# Altium PCB sciencelayout.PcbDoc
Units mm, origin at the board's own origin, x right, y up, seen from the top; angles counter-clockwise.
Board outline 63.5 x 88.9 mm, 2 copper layers (Top Layer, Bottom Layer); 114 components, 56 nets, 362 pads, 0 vias.
Unrouted connection lines stored in the file: 252.
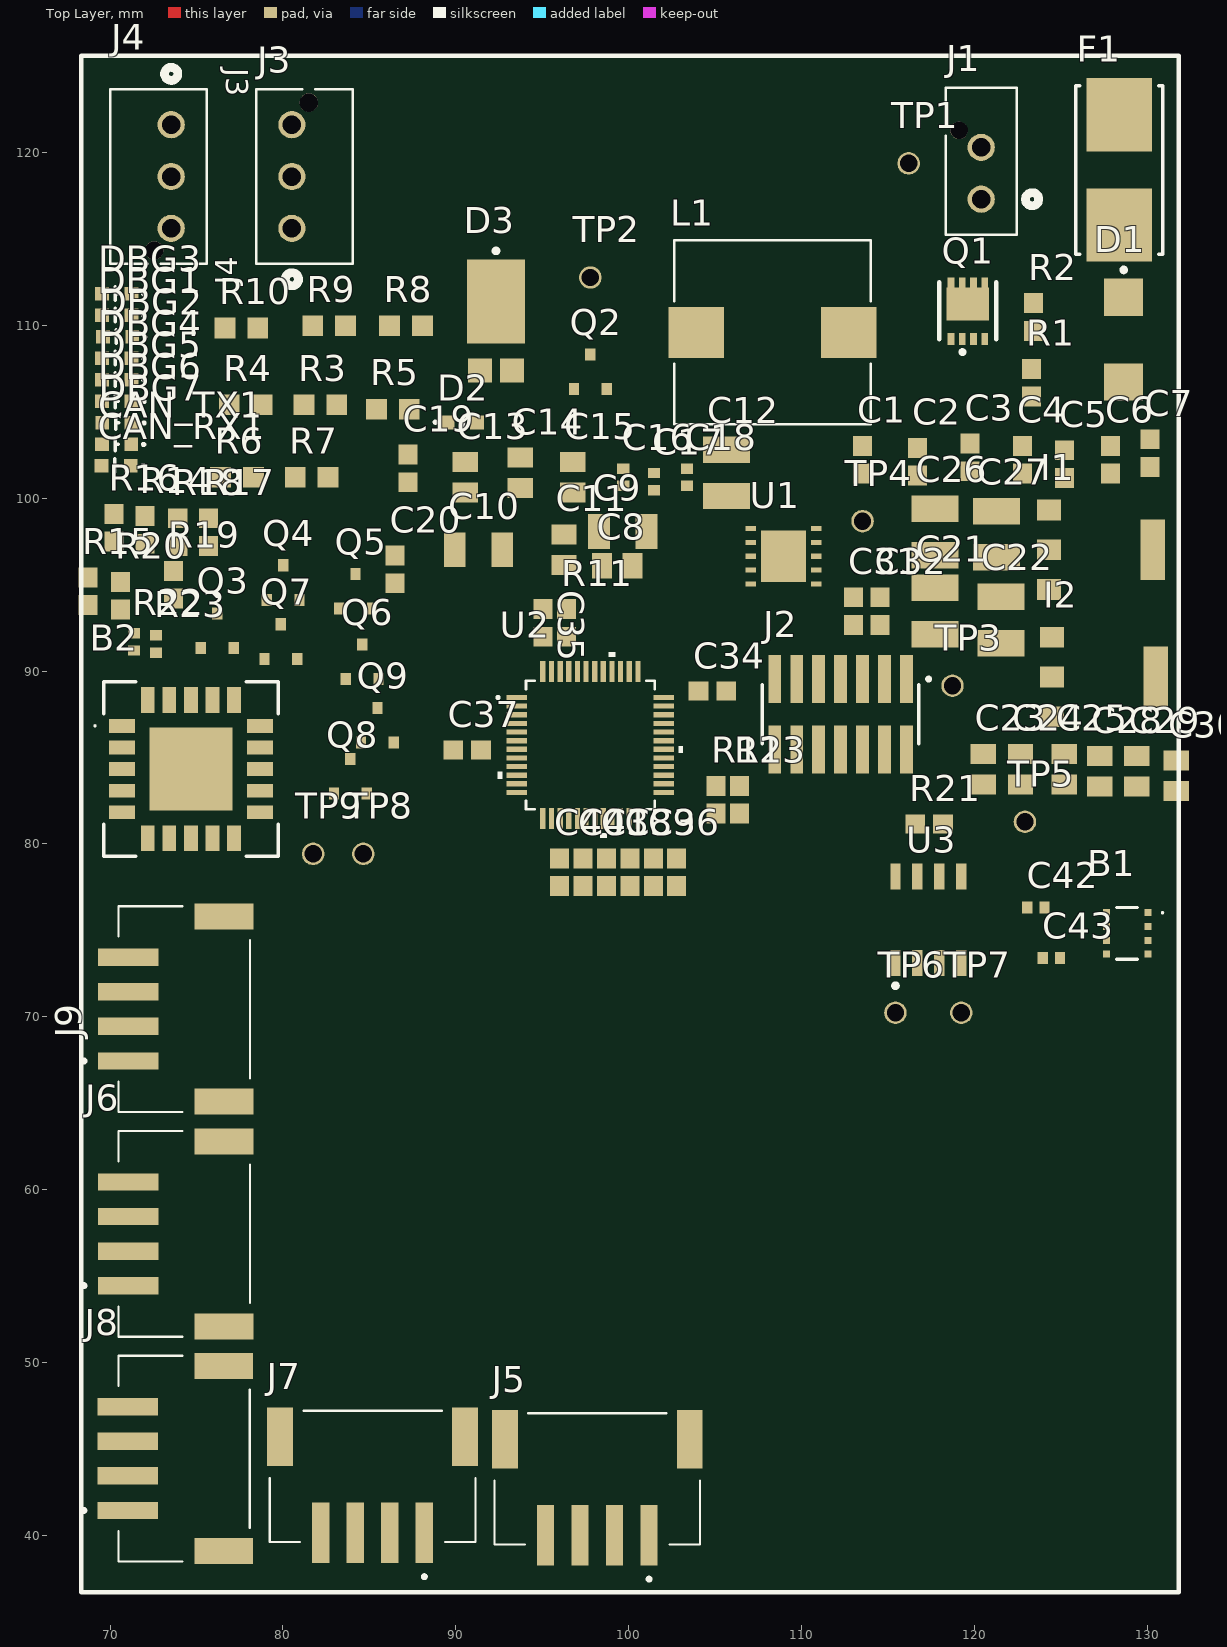
[diagram p0: Top Layer view]
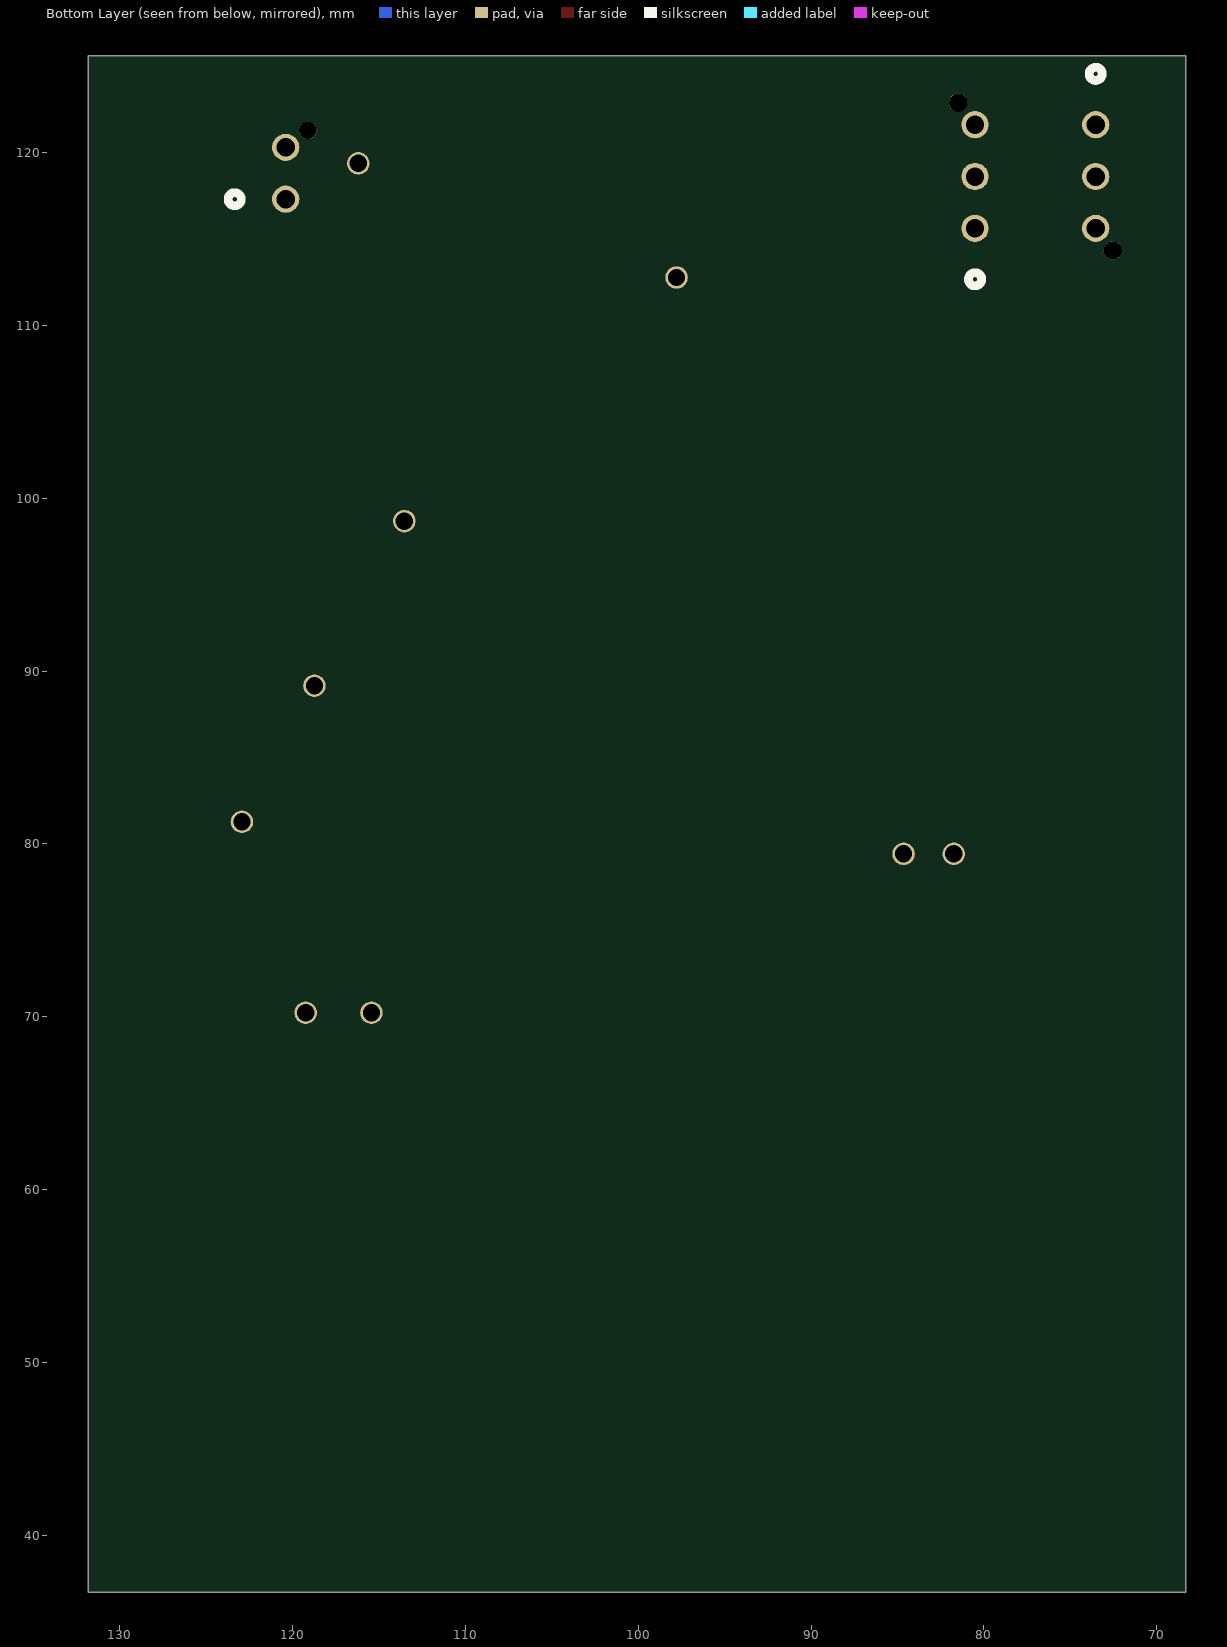
[diagram p1: Bottom Layer view, seen from below]

## Layer stack, top to bottom
Top Solder: solder mask 0.0102, Solder Resist, Dk 3.5
Top Layer: signal copper 0.0356
Dielectric 1: dielectric 0.32, FR-4, Dk 4.8
Bottom Layer: signal copper 0.0356
Bottom Solder: solder mask 0.0102, Solder Resist, Dk 3.5

## Board outline
68.326,36.703 68.326,125.603 131.826,125.603 131.826,36.703

## Design rules (kind name [scope] priority, off if disabled: settings)
Clearance [All] p1: gap=0.254 ignorepadtopadclearanceinfootprint=FALSE
PolygonConnect [All] p1: connectstyle=Relief reliefconductorwidth=0.254 reliefentries=4 polygonreliefangle="90 Angle" airgapwidth=0.254
RoutingVias [All] p1: holewidth=0.711 width=1.27 viastyle="Through Hole" minholewidth=0.711 minwidth=1.27 maxholewidth=0.711 maxwidth=1.27
SolderMaskExpansion [All] p1: expansion=0 istentingtop=FALSE
SupplyNets "Schematic Supply Nets_6" [InNet('VDD')] p1: voltage=0.000
SupplyNets "Schematic Supply Nets_5" [InNet('7V')] p2: voltage=0.000
SupplyNets "Schematic Supply Nets_4" [InNet('VBAT')] p3: voltage=0.000
SupplyNets "Schematic Supply Nets_3" [InNet('GND')] p4: voltage=0.000
SupplyNets "Schematic Supply Nets_2" [InNet('VBAT_FUSED_7')] p5: voltage=0.000
SupplyNets "Schematic Supply Nets_1" [InNet('5V')] p6: voltage=0.000
Width [All] p1: maxlimit=0.254 minlimit=0.254 preferedwidth=0.254
30 further rules are at their usual default settings.

## Classes and differential pairs
component class THP_Sensor: B1 C42 C43
component class MCU: C31 C32 C34 C35 C36 C37 C38 C39 C40 C41 J2 R11 R12 R13 U2
component class LDOs: C21 C22 C23 C24 C25 C26 C27 C28 C29 C30 I1 I2 TP3 TP4 TP5
component class "Input Power": C1 C2 C3 C4 C5 C6 C7 D1 F1 J1 Q1 R1 R2 TP1
component class Headers: J5 J6 J7 J8 J9 M2
component class "Debugging LED": DBG1 DBG2 DBG3 DBG4 DBG5 DBG6 DBG7 Q3 Q4 Q5 Q6 Q7 R14 R15 R16 R17 R18 R19 R20
component class CO2_Sensor: B2 TP8 TP9
component class CAN: CAN_RX1 CAN_TX1 J3 J4 Q8 Q9 R21 R22 R23 TP6 TP7 U3
component class "7V Buck": C8 C9 C10 C11 C12 C13 C14 C15 C16 C17 C18 C19 C20 D2 D3 D23 L1 L2 Q2 R3 R4 R5 R6 R7 R8 R9 R10 TP2 U1 U9

## Components (designator, comment, footprint, x,y, rotation, side; value= is the part's Value field where it differs from the comment)
B1 "BME688" BME688 128.848,74.822 r0 top
B2 "SCD43-D-R2" SCD43DR2 74.676,84.328 r0 top
C1 "GRJ32ER71H106KE11L" CAP-0603 113.538,102.235 r270 top
C2 "GRJ32ER71H106KE11L" CAP-0603 116.713,102.108 r90 top
C3 "GRJ32ER71H106KE11L" CAP-0603 119.761,102.362 r90 top
C4 "GCM188R71H104KA57D" CAP-0603 122.809,102.235 r90 top
C5 "GRM1885C1H103JA01D" CAP-0603 125.222,101.981 r90 top
C6 "GRM1885C1H102JA01D" CAP-0603 127.889,102.235 r90 top
C7 "GRM1885C1H101JA01D" CAP-0603 130.175,102.616 r90 top
C8 "CC0805KRX7R9BB104" CAP-0805 99.354,96.088 r0 top
C9 "CC1206KKX7R0BB225" CAP-1206 99.664,98.077 r0 top
C10 "CC1206KKX7R0BB225" CAP-1206 91.313,97.028 r0 top
C11 "GRM2165C1H272JA01D" CAP-0805 96.266,97.028 r90 top
C12 "CL32B106KBJNNNE" CAP-1210 105.664,101.473 r90 top
C13 "CC0805KKX7R9BB105" CAP-0805 90.551,101.219 r90 top
C14 "CC0805KRX7R9BB104" CAP-0805 93.726,101.473 r90 top
C15 "GRM2195C1H103JA01D" CAP-0805 96.774,101.219 r90 top
C16 "CC0402KRX7R9BB102" CAP-0402 99.695,101.219 r90 top
C17 "CC0402JRNPO9BN101" CAP-0402 101.473,100.965 r90 top
C18 "CC0402JRNPO9BN100" CAP-0402 103.378,101.219 r90 top
C19 "GRM1885C1H302JA01D" CAP-0603 87.249,101.727 r90 top
C20 "CC0603CRNPO0BN6R8" CAP-0603 86.487,95.885 r90 top
C21 "CL32B106KMVNNWE" CAP-1210 117.729,93.472 r90 top
C22 "CL32B106KMVNNWE" CAP-1210 121.539,92.964 r90 top
C23 "CL21B104KBCNNNC" CAP-0805 120.523,84.328 r90 top
C24 "C0805C471K5RACTU" CAP-0805 122.682,84.328 r90 top
C25 "CC0805JKX7R9BB105" CAP-0805 125.222,84.328 r90 top
C26 "CL32B106KMVNNWE" CAP-1210 117.729,98.044 r90 top
C27 "CL32B106KMVNNWE" CAP-1210 121.285,97.917 r90 top
C28 "CL21B104KBCNNNC" CAP-0805 127.254,84.201 r90 top
C29 "C0805C471K5RACTU" CAP-0805 129.413,84.201 r90 top
C30 "CC0805JKX7R9BB105" CAP-0805 131.699,83.947 r90 top
C31 "CAP 0603" CAP-0603 113.03,93.472 r90 top
C32 "CAP 0603" CAP-0603 114.554,93.472 r90 top
C33 "CAP 0603" CAP-0603 102.784,78.359 r90 top
C34 "CAP 0603" CAP-0603 104.85,88.845 r180 top
C35 "CAP 0603" CAP-0603 95.056,92.785 r270 top
C36 "CAP 0603" CAP-0603 101.43,78.359 r90 top
C37 "CAP 0603" CAP-0603 90.658,85.428 r180 top
C38 "CAP 0603" CAP-0603 98.722,78.359 r90 top
C39 "CAP 0603" CAP-0603 100.076,78.359 r90 top
C40 "CAP 0603" CAP-0603 96.014,78.359 r90 top
C41 "CAP 0603" CAP-0603 97.368,78.359 r90 top
C42 "CAP 0402" CAP-0402 123.571,76.327 r0 top
C43 "CAP 0402" CAP-0402 124.468,73.406 r0 top
CAN_RX1 "BL-HKC36G-AV-TRB" LED-0603 71.787,102.632 r180 top
CAN_TX1 "BL-HKC36G-AV-TRB" LED-0603 71.815,103.876 r180 top
D1 "SMBJ40CA" "DO-214AA (SMBJ)" 128.651,109.149 r90 top
D2 "BL-HKC36G-AV-TRB" LED-0603 88.946,103.643 r0 top
D3 "PDS760-13" DO-POWERDI5 92.329,110.253 r90 top
DBG1 "BL-HKC36G-AV-TRB" LED-0603 71.824,111.343 r180 top
DBG2 "BL-HKC36G-AV-TRB" LED-0603 71.874,110.098 r180 top
DBG3 "BL-HKC36G-AV-TRB" LED-0603 71.824,112.587 r180 top
DBG4 "BL-HKC36G-AV-TRB" LED-0603 71.824,108.854 r180 top
DBG5 "BL-HKC36G-AV-TRB" LED-0603 71.824,107.609 r180 top
DBG6 "BL-HKC36G-AV-TRB" LED-0603 71.824,106.365 r180 top
DBG7 "BL-HKC36G-AV-TRB" LED-0603 71.836,105.121 r180 top
F1 "01550900M" FUSE-0001 128.397,118.999 r90 top
I1 "LM1117IMPX-3.3/NOPB" IC-SOT-223-4 127.333,97.028 r0 top
I2 "LM1117MPX-5.0/NOPB" IC-SOT-223-4 127.508,89.662 r0 top
J1 "2068320201" CONN_2068320000-SD_02_MOL 120.406,117.305 r0 top
J2 "FTSH-107-01-L-DV-K" SAMTEC_FTSH-107-01-L-DV-K 112.268,87.506 r180 top
J3 "2165712003" CONN_2165710003-SD_03_MOL 80.518,115.618 r270 top
J4 "2165712003" CONN_2165710003-SD_03_MOL 73.533,121.618 r90 top
J5 "CONN-4POS-03" CONN-4POS-03 98.189,42.756 r180 top
J6 "CONN-4POS-03" CONN-4POS-03 73.788,57.438 r90 top
J7 "CONN-4POS-03" CONN-4POS-03 85.185,42.898 r180 top
J8 "CONN-4POS-03" CONN-4POS-03 73.781,44.434 r90 top
J9 "CONN-4POS-03" CONN-4POS-03 73.787,70.442 r90 top
L1 "BMRF001010401R0MD1" IND-10UH-0001 108.331,109.601 r0 top
Q1 "CSD18543Q3AT" IC-8VSONCLIP 117.797,108.335 r0 top
Q2 "T2N7002AK,LM" IC-SOT23-3 97.79,107.315 r0 top
Q3 "T2N7002AK,LM" IC-SOT23-3 76.2,92.345 r0 top
Q4 "T2N7002AK,LM" IC-SOT23-3 80.01,95.123 r0 top
Q5 "T2N7002AK,LM" IC-SOT23-3 84.201,94.615 r0 top
Q6 "T2N7002AK,LM" IC-SOT23-3 84.582,90.551 r0 top
Q7 "T2N7002AK,LM" IC-SOT23-3 79.883,91.71 r0 top
Q8 "T2N7002AK,LM" IC-SOT23-3 83.904,83.914 r0 top
Q9 "T2N7002AK,LM" IC-SOT23-3 85.471,86.868 r0 top
R1 "RC0603JR-07200KL" RES-0603 123.317,106.68 r90 top
R2 "RC0603FR-07100KL" RES-0603 123.444,110.49 r90 top
R3 "ERJ-6GEYJ241V" RES-0805 82.169,105.41 r0 top
R4 "CRCW08051K00FKEA" RES-0805 77.851,105.41 r0 top
R5 "CRCW08052M15FKEA" RES-0805 86.36,105.156 r0 top
R6 "RC0805FR-07178KL" RES-0805 77.343,101.219 r0 top
R7 "CRCW080580K6FKEA" RES-0805 81.661,101.219 r0 top
R8 "ERA-6AEB104V" RES-0805 87.122,109.982 r0 top
R9 "RC0805FR-0736K5L" RES-0805 82.677,109.982 r0 top
R10 "RT0805BRD0710K4L" RES-0805 77.597,109.855 r0 top
R11 "RES 0603" RES-0603 96.411,92.785 r270 top
R12 "RES 0603" RES-0603 105.072,82.55 r270 top
R13 "RES 0603" RES-0603 106.426,82.55 r270 top
R14 "RES 0603" RES-0603 72.009,98.171 r90 top
R15 "RES 0603" RES-0603 68.707,94.615 r90 top
R16 "RES 0603" RES-0603 70.231,98.298 r90 top
R17 "RES 0603" RES-0603 75.692,98.044 r90 top
R18 "RES 0603" RES-0603 73.914,98.044 r90 top
R19 "RES 0603" RES-0603 73.66,94.996 r90 top
R20 "RES 0603" RES-0603 70.612,94.361 r90 top
R21 "RES 0603" RES-0603 117.386,81.153 r180 top
R22 "RES 0402" RES-0402 71.374,91.694 r90 top
R23 "RES 0603" RES-0402 72.644,91.567 r90 top
TP1 "5003" TEST-POINT-0001 116.205,119.38 r0 top
TP2 "5003" TEST-POINT-0001 97.79,112.776 r0 top
TP3 "5003" TEST-POINT-0001 118.745,89.154 r0 top
TP4 "5003" TEST-POINT-0001 113.538,98.679 r0 top
TP5 "5003" TEST-POINT-0001 122.936,81.28 r0 top
TP6 "5003" TEST-POINT-0001 115.443,70.231 r0 top
TP7 "5003" TEST-POINT-0001 119.253,70.231 r0 top
TP8 "5003" TEST-POINT-0001 84.652,79.425 r0 top
TP9 "5003" TEST-POINT-0001 81.748,79.425 r0 top
U1 "" IC-10WSON 108.966,96.647 r0 top
U2 "STM32G431CBT6" IC-LQFP48 97.79,85.725 r0 top
U3 "TCAN1044VDRQ1" IC-8SOIC 117.348,75.605 r0 top

## Footprints (in the part's own frame and the unit in brackets; to place one, negate y for a bottom-side part, rotate by r counter-clockwise, add the part's x,y. Pads: shape width x height; smd on the part's side, far side on the other; paste and mask are expansions set on the pad)
BME688 [mm]
  rect 0.4x0.4 smd: 1(1.2,1.2) 2(1.2,0.4) 3(1.2,-0.4) 4(1.2,-1.2) 5(-1.2,-1.2) 6(-1.2,-0.4) 7(-1.2,0.4) 8(-1.2,1.2)
  silkscreen extent -0.6,-1.5 2.1,1.5
CAP-0402 [mm]
  rect 0.6x0.7 smd: 1(-0.5,0) 2(0.5,0)
  body extent -0.5,-0.22 0.5,0.23, height 0.5
CAP-0603 [mm]
  rect 1.15x1.1 smd: 1(-0.8,0) 2(0.8,0)
  body extent -0.8,-0.45 0.8,0.45, height 0.8
CAP-0805 [mm]
  rect 1.16x1.47 smd: 1(-0.88,0) 2(0.88,0)
  body extent -1,-0.63 1,0.63, height 0.94
CAP-1206 [mm]
  rect 1.25x2 smd: 1(-1.375,0) 2(1.375,0)
  body extent -1.6,-0.8 1.6,0.8, height 1.5
CAP-1210 [mm]
  rect 1.53x2.72 smd: 1(-1.341,0) 2(1.341,0)
  body extent -1.6,-1.25 1.6,1.25, height 2.7
CONN-4POS-03 [mm] "JST 4 pin right angle"
  rect 1x3.5 smd paste+0 mask+0.102: 1(-3,2.75) 2(-1,2.75) 3(1,2.75) 4(3,2.75)
  rect 1.5x3.4 smd paste+0 mask+0.102: T1(-5.35,-2.8) T2(5.35,-2.8)
  silkscreen extent -5.95,-4.3 5.95,5.4, body extent -5.95,-4.3 5.95,4.3, height 5.5
CONN_2068320000-SD_02_MOL [mil]
  round 62 / inner round 60 / far side round 62 hole 42 paste-99999 mask+0: 1(0,0) 2(0,118.11)
  round 40 / inner round 60 / far side round 40 hole 40 unplated paste-99999 mask+0: 3(-50.39,156.69)
  silkscreen extent -81,-81 131,254, body extent -76,-76 76,249, height 392
CONN_2165710003-SD_03_MOL [mil]
  round 62 hole 42 paste-99999 mask+0: 1(0,0) 2(-118.11,0) 3(-236.22,0)
  round 42 hole 42 unplated paste-99999 mask+0: 4(-286.61,38.58)
  silkscreen extent -317,-81 131,139, body extent -312,-75 76,135, height 394
"DO-214AA (SMBJ)" [mm]
  rect 2.16x2.26 smd: 1(-2.416,0) 2(2.484,0)
  silkscreen extent 3.94,-0.13 4.19,0.12, body extent -2.72,-1.95 2.78,1.95, height 2.45
DO-POWERDI5 [mm] "SMD, 3-Leads, Body 3.975x5.375mm, Pitch 1.84mm"
  rect 1.4x1.39 smd: 1(-2.856,-0.92) 1(-2.856,0.92)
  rect 4.86x3.36 smd: 2(1.126,0)
  silkscreen extent 3.94,-0.13 4.19,0.12, body extent -3.25,-1.98 3.25,1.98, height 1.15
FUSE-0001 [mil]
  rect 167x150 smd paste+0 mask+0: 1(-125.5,0) 2(125.5,0)
  silkscreen extent -192,-99 192,99, body extent -213,-103 213,103, height 10
IC-8SOIC [mm]
  rect 0.6x1.5 smd: 1(-1.905,-2.5) 2(-0.635,-2.5) 3(0.635,-2.5) 4(1.905,-2.5) 5(1.905,2.5) 6(0.635,2.5) 7(-0.635,2.5) 8(-1.905,2.5)
  silkscreen extent -2.03,-3.93 -1.78,-3.69, body extent -2.45,-3 2.45,3, height 1.75
IC-8VSONCLIP [mm]
  rect 0.4x0.7 smd paste-100 mask+0.05: 1(2.812,0.877) 2(0.862,0.877) 2(1.512,0.877) 2(2.162,0.877) 3(0.862,4.077) 3(1.512,4.077) 3(2.162,4.077) 3(2.812,4.077)
  rect 2.45x1.9 smd paste-100 mask+0.05: 3(1.837,2.917)
  silkscreen extent 0.19,0.03 3.49,4.18, body extent 0.18,0.89 3.48,4.19, height 1.1
IC-10WSON [mm]
  rect 0.6x0.3 smd: 1(-1.9,1.6) 2(-1.9,0.8) 3(-1.9,0) 4(-1.9,-0.8) 5(-1.9,-1.6) 6(1.9,-1.6) 7(1.9,-0.8) 8(1.9,0) 9(1.9,0.8) 10(1.9,1.6)
  rect 2.6x3 smd: 11(0,0)
  body extent -2,-2 2,2, height 0.8
IC-LQFP48 [mm]
  rect 1.194x0.305 smd paste+0 mask+0: 1(-4.25,2.75) 2(-4.25,2.25) 3(-4.25,1.75) 4(-4.25,1.25) 5(-4.25,0.75) 6(-4.25,0.25) 7(-4.25,-0.25) 8(-4.25,-0.75) 9(-4.25,-1.25) 10(-4.25,-1.75) 11(-4.25,-2.25) 12(-4.25,-2.75) 25(4.25,-2.75) 26(4.25,-2.25) 27(4.25,-1.75) 28(4.25,-1.25) 29(4.25,-0.75) 30(4.25,-0.25) 31(4.25,0.25) 32(4.25,0.75) 33(4.25,1.25) 34(4.25,1.75) 35(4.25,2.25) 36(4.25,2.75)
  rect 0.305x1.194 smd paste+0 mask+0: 13(-2.75,-4.25) 14(-2.25,-4.25) 15(-1.75,-4.25) 16(-1.25,-4.25) 17(-0.75,-4.25) 18(-0.25,-4.25) 19(0.25,-4.25) 20(0.75,-4.25) 21(1.25,-4.25) 22(1.75,-4.25) 23(2.25,-4.25) 24(2.75,-4.25) 37(2.75,4.25) 38(2.25,4.25) 39(1.75,4.25) 40(1.25,4.25) 41(0.75,4.25) 42(0.25,4.25) 43(-0.25,4.25) 44(-0.75,4.25) 45(-1.25,4.25) 46(-1.75,4.25) 47(-2.25,4.25) 48(-2.75,4.25)
  silkscreen extent -5.43,-5.35 5.35,5.35, body extent -4.5,-4.5 4.5,4.5, height 1.6
IC-SOT23-3 [mm]
  rect 0.6x0.7 smd: 1(-0.95,-1) 2(0.95,-1) 3(0,1)
  body extent -1.46,-1.18 1.46,1.19, height 1.12
IC-SOT-223-4 [mm]
  rect 1.4x1.2 smd mask+0.07: 1(-3,2.3) 3(-3,-2.3) 4(-3,0)
  rect 1.4x3.5 smd: 2(3,0)
  body extent -3.5,-3.25 3.5,3.25, height 1.68
IND-10UH-0001 [mil]
  rect 126x116 smd paste+0 mask+0: 1(-173.5,0) 2(173.5,0)
  silkscreen extent -224,-210 224,210, body extent -229,-204 229,204, height 157
LED-0603 [mm]
  rect 0.8x0.8 smd: 1(2.291,0.751) 2(0.589,0.751)
  silkscreen extent -0.2,0.34 1.52,1.13, body extent 0.65,0.36 2.25,1.16, height 0.39
RES-0402 [mm]
  rect 0.6x0.7 smd: 1(-0.5,0) 2(0.5,0)
  body extent -0.5,-0.25 0.5,0.25, height 0.3
RES-0603 [mm]
  rect 1.15x1.1 smd: 1(-0.8,0) 2(0.8,0)
  body extent -0.8,-0.4 0.8,0.4, height 0.43
RES-0805 [mm]
  rect 1.2x1.2 smd: 1(-0.95,0) 2(0.95,0)
  body extent -1,-0.6 1,0.6, height 0.71
SAMTEC_FTSH-107-01-L-DV-K [mm]
  rect 0.74x2.79 smd: 01(-3.81,-2.035) 02(-3.81,2.035) 03(-2.54,-2.035) 04(-2.54,2.035) 05(-1.27,-2.035) 06(-1.27,2.035) 07(0,-2.035) 08(0,2.035) 09(1.27,-2.035) 10(1.27,2.035) 11(2.54,-2.035) 12(2.54,2.035) 13(3.81,-2.035) 14(3.81,2.035)
  silkscreen extent -5.2,-2.13 4.53,1.72, body extent -4.45,-2.82 4.44,3.02, height 5.96
SCD43DR2 [mm]
  rect 1.5x0.8 smd: 1(-4,2.5) 2(-4,1.25) 3(-4,0) 4(-4,-1.25) 5(-4,-2.5) 11(4,-2.5) 12(4,-1.25) 13(4,0) 14(4,1.25) 15(4,2.5)
  rect 0.8x1.5 smd: 6(-2.5,-4) 7(-1.25,-4) 8(0,-4) 9(1.25,-4) 10(2.5,-4) 16(2.5,4) 17(1.25,4) 18(0,4) 19(-1.25,4) 20(-2.5,4)
  rect 4.8x4.8 smd: 21(0,0)
  silkscreen extent -5.6,-5.05 5.05,5.05
TEST-POINT-0001 [mm] "2024 miniature test point"
  round 1.3 hole 1: 1(0,0)
  body extent -1.27,-1.27 1.27,1.27, height 4.57

## Part data
B1: "Gas sensor measuring relative humidity, barometric pressure, ambient temperature and gas (VOC)", Manufacturer_Name=BOSCH, Mouser Part Number=262-BME688, Arrow Part Number=BME688, Arrow Price/Stock=https://www.arrow.com/en/products/bme688/bosch-sensortec.html?utm_currency=USD&region=nac, Datasheet Link=https://www.bosch-sensortec.com/media/boschsensortec/downloads/datasheets/bst-bme688-ds000.pdf, Geometry.Height=1mm, Manufacturer_Part_Number=BME688, Mouser Price/Stock=https://www.mouser.co.uk/ProductDetail/Bosch-Sensortec/BME688?qs=IS%252B4QmGtzzqQoVDscqwx3A%3D%3D
B2: "Carbon Dioxide (CO2) Sensor Voltage 2.4V ~ 5.5V , 205mA , 400 kHz  -10C ~ 60C", Manufacturer_Name=Sensirion, Datasheet Link=https://sensirion.com/media/documents/48C4B7FB/67FE0194/CD_DS_SCD4x_Datasheet_D1.pdf, Geometry.Height=6.8mm, Manufacturer_Part_Number=SCD43-D-R2
C1: library part "CAP 0603", Capacitance=100uF, Voltage Rating=50V
C2: library part "CAP 0603", Capacitance=10uF, Voltage Rating=50V
C3: library part "CAP 0603", Capacitance=1uF, Voltage Rating=50V
C4: library part "CAP 0603", Capacitance=100nF, Voltage Rating=50V
C5: library part "CAP 0603", Capacitance=10nF, Voltage Rating=50V
C6: library part "CAP 0603", Capacitance=1nF, Voltage Rating=50V
C7: library part "CAP 0603", Capacitance=100pF, Voltage Rating=50V
C8 C14: library part CAP-0.1U-0002, "CAP CER 0.1UF 50V X7R 0805", Capacitance="100 nF", Voltage Rating="50 V", ComponentLink2Description=Datasheet, ComponentLink2URL=https://www.yageo.com/upload/media/product/productsearch/datasheet/mlcc/UPY-GPHC_X7R_6.3V-to-250V_24.pdf, Device Class=Ceramic, Size=0805
C9 C10: library part CAP-2.2U-0001, "CAP CER 2.2UF 100V X7R 1206", Capacitance=2.2uF, Voltage=100V, ComponentLink1Description=Datasheet, ComponentLink1URL=https://www.yageo.com/upload/media/product/productsearch/datasheet/mlcc/UPY-GPHC_X7R_6.3V-to-250V_24.pdf, Device Class=Ceramic, Size=1206
C11: library part CAP-2.7N-0001, "CAP CER 2700PF 50V C0G/NP0 0805", Capacitance=2.7nF, Voltage=50V, ComponentLink1Description=Datasheet, ComponentLink1URL=https://search.murata.co.jp/Ceramy/image/img/A01X/G101/ENG/GRM2165C1H272JA01-01.pdf, Device Class=Ceramic, Size=0805
C12: library part CAP-10U-0002, "CAP CER 10UF 50V X7R 1210", Capacitance="10 uF", Voltage=50V, ComponentLink1Description=Datasheet, ComponentLink1URL=https://mm.digikey.com/Volume0/opasdata/d220001/medias/docus/41/CL32B106KBJNNNE_Spec.pdf, Device Class=Ceramic, Size=1210
C13: library part CAP-1U-0001, "CAP CER 1UF 50V X7R 0805", Capacitance="1.0 uF", Voltage="50 V", ComponentLink2Description=Datasheet, ComponentLink2URL=https://www.yageo.com/upload/media/product/productsearch/datasheet/mlcc/UPY-GPHC_X7R_6.3V-to-250V_24.pdf, Device Class=Ceramic, Size=0805
C15: library part CAP-10N-0001, "CAP CER 10000PF 50V C0G/NP0 0805", Capacitance=10nF, Voltage=50V, ComponentLink1Description=Datasheet, ComponentLink1URL=https://search.murata.co.jp/Ceramy/image/img/A01X/G101/ENG/GRM2195C1H103JA01-01.pdf, Device Class=Ceramic, Size=0805
C16: library part CAP-1N-0001, "CAP CER 1000PF 50V X7R 0402", Capacitance="1.0 nF", Voltage="50 V", ComponentLink2Description=Datasheet, ComponentLink2URL=http://www.yageo.com/documents/recent/UPY-GP_NP0_16V-to-50V_16.pdf, Device Class=Ceramic, Size=0402
C17: library part CAP-100P-0001, "CAP CER 100PF 50V C0G/NPO 0402", Capacitance="100 pF", Voltage=50V, ComponentLink1Description=Datasheet, ComponentLink1URL=https://www.yageo.com/upload/media/product/productsearch/datasheet/mlcc/UPY-GP_NP0_16V-to-50V_18.pdf, Device Class=Ceramic, Size=0402
C18: library part CAP-10P-0001, "CAP CER 10PF 50V C0G/NPO 0402", Capacitance="10 pF", Voltage=50V, ComponentLink1Description=Datasheet, ComponentLink1URL=https://www.yageo.com/upload/media/product/productsearch/datasheet/mlcc/UPY-GP_NP0_16V-to-50V_18.pdf, Device Class=Ceramic, Size=0402
C19: library part CAP-3N-0001, "3000 pF ±5% 50V Ceramic Capacitor C0G, NP0 0603 (1608 Metric)", Capacitance="3 nF", Voltage=50V, ComponentLink1Description=Datasheet, ComponentLink1URL=https://mm.digikey.com/Volume0/opasdata/d220001/medias/docus/41/CL32B106KBJNNNE_Spec.pdf, Device Class=Ceramic, Size=1210
C20: library part CAP-6.8P-0001, "CAP CER 6.8PF 100V C0G/NPO 0603", Capacitance=6.8pF, Voltage=100V, ComponentLink1Description=Datasheet, ComponentLink1URL=https://www.yageo.com/upload/media/product/productsearch/datasheet/mlcc/UPY-GPHC_X7R_6.3V-to-250V_24.pdf, Device Class=Ceramic, Size=0603
C21 C22 C26 C27: library part "CAP 1210", Capacitance="10 uF", Voltage Rating=50V
C23 C28: library part "CAP 0805", Capacitance="100 nF", Voltage Rating=16V
C24 C29: library part "CAP 0805", Capacitance="470 pF", Voltage Rating=50V
C25 C30: library part "CAP 0805", Capacitance="1 uF", Voltage Rating=16V
C31 C33 C34 C35 C37 C41: Capacitance="100 nF", Voltage Rating=16V
C32 C36: Capacitance="4.7 uF", Voltage Rating=16V
C38: Capacitance="10 nF", Voltage Rating=50V
C39 C40: Capacitance="1 uF", Voltage Rating=16V
C42 C43: capacitor=100nF, Voltage Rating=V
CAN_RX1 CAN_TX1 D2 DBG1 DBG2 DBG3 DBG4 DBG5 DBG6 DBG7: library part LED-0001, "LED YELLOW CLEAR 0603 SMD", Forward Current=30mA, Forward Voltage=2V, ComponentLink1Description=Datasheet, ComponentLink1URL=https://www.americanbrightled.com/pdffiles/led-components/smt/BL-HKC36G-AV-TRB.pdf
D1: library part DIO-TVS-0001, "TVS DIODE 40VWM 64.5VC DO214AA", Current Rating=9.3A, Voltage Rating=64.5V, ComponentLink1Description=Datasheet, ComponentLink1URL=https://www.littelfuse.com/media?resourcetype=datasheets&itemid=09a6ae9a-73cb-4ac4-acac-e6dab92ab953&filename=littelfuse_tvs_diode_smbj_datasheet.pdf
D3: library part DIO-SCHOTTKY-0001, "DIODE SCHOTTKY 60V 7A POWERDI5", Forward Current=7A, Reverse Voltage (DC)=60V, ComponentLink1Description=Datasheet, ComponentLink1URL=https://www.diodes.com/assets/Datasheets/PDS760.pdf
F1: library part FUSE-0001, "FUSE BLOK CARTRIDGE 125V 10A SMD", Fuse Current=8A, Voltage Rating=125V, ComponentLink2Description=Datasheet, ComponentLink2URL=https://www.littelfuse.com/~/media/electronics/datasheets/fuses/littelfuse_fuse_154_154t_154l_154tl_datasheet.pdf.pdf
I1: library part IC_LDO_3V3_0001, "IC REG LIN 3.3V 800MA SOT223-4", ComponentLink1Description="New link", ComponentLink1URL=https://www.ti.com/lit/ds/symlink/lm1117.pdf?HQS=dis-dk-null-digikeymode-dsf-pf-null-wwe&ts=1721700739746
I2: library part IC_LDO_5V_0001, "IC REG LINEAR 5V 800MA SOT223-4", ComponentLink1Description=Datasheet, ComponentLink1URL=https://www.ti.com/lit/ds/symlink/lm1117.pdf?HQS=dis-dk-null-digikeymode-dsf-pf-null-wwe&ts=1721700739746
J1: library part "CONN MF+ 2 PIN VERT", "Micro-Fit+ Vertical Header, Through Hole, 3.00mm Pitch, Dual Row, 2 Circuits, Tin (Sn) Plating, Glow-Wire Capable, Black, Tray", Manufacturer_Name="Molex Connector Corporation", Copyright="Copyright (C) 2025 Ultra Librarian. All rights reserved.", Manufacturer_Part_Number=2068320201, RefDes=RefDes, Type=Type
J2: library part CONN_Flashing-0001, "Connector Header Surface Mount 14 position 0.050\" (1.27mm)", Package=None, Availability=Unavailable, ComponentLink1Description=Datasheet, ComponentLink1URL=https://mm.digikey.com/Volume0/opasdata/d220001/medias/docus/6209/ftsh-1xx-xx-xxx-dv-xxx-xxx-x-xx-mkt.pdf, MF=Samtec, MP=FTSH-107-01-L-DV-K, Price=None
J3 J4: library part "CONN MF+ 3 PIN VERT", "Micro-Fit+ Vertical Header, Through Hole, 3.00mm Pitch, Single Row, 3 Circuits, 0.38Âµm Gold (Au) Plating, Glow-Wire Capable, Black", Manufacturer_Name="Molex Connector Corporation", Copyright="Copyright (C) 2026 Ultra Librarian. All rights reserved.", Manufacturer_Part_Number=2165712003, RefDes=RefDes, Type=Type
J5 J6 J7 J8 J9: "Connector Header Surface Mount, Right Angle 4 position 0.079\" (2.00mm)", MANUFACTURER="JST Sales", MAXIMUM_PACKAGE_HEIGHT=5.5mm, MPN=S4B-PH-SM4-TB, DATASHEET_URL=https://s3.amazonaws.com/snapeda/datasheet/S4B-PH-SM4-TB_JST.pdf, SOURCE_URL=https://www.snapeda.com/parts/S4B-PH-SM4-TB/JST/view-part/, STANDARD="Manufacturer Recommendations", UNIT=MM
L1: library part IND-10U-0001, "FIXED IND 10UH 6.5A 30 MOHM SMD", Current Rating=6.5A, Inductance=10uH, ComponentLink1Description=Datasheet, ComponentLink1URL=https://productfinder.pulseelectronics.com/api/open/part-attachments/datasheet/BMRF001010401R0MD1
Q1: library part NMOS-60A-0001, "MOSFET N-CH 60V 12A/60A 8VSON", Continuous Current=60A, Voltage=60V, ComponentLink2Description=Datasheet, ComponentLink2URL=http://www.ti.com/lit/ds/symlink/csd18543q3a.pdf
Q2 Q3 Q4 Q5 Q6 Q7 Q8 Q9: library part NMOS-200MA-0001, "MOSFET N-CH 60V 200MA SOT23", Continuous Current=200mA, Voltage=60V, ComponentLink1Description=Datasheet, ComponentLink1URL=https://toshiba.semicon-storage.com/info/T2N7002AK_datasheet_en_20150401.pdf?did=29712&prodName=T2N7002AK
R1: library part "RES 0603", Power=100mW, Resistance=200kOhm
R2: library part "RES 0603", Resistance=100kOhm, Wattage=100mW
R3: library part "RES 0805", Resistance=240Ω, Wattage=W
R4: library part "RES 0805", Resistance=1kΩ, Wattage=W
R5: library part "RES 0805", Resistance="2.15 MΩ", Wattage=W
R6: library part "RES 0805", Resistance=178kΩ, Wattage=W
R7: library part "RES 0805", Resistance=80.6kΩ, Wattage=W
R8: library part "RES 0805", Resistance=100kΩ, Wattage=W
R9: library part "RES 0805", Resistance=36.5kΩ, Wattage=W
R10: library part "RES 0805", Resistance=10.4kΩ, Wattage=W
R11: Resistance=0Ω, Wattage="100 mW"
R12 R13: Resistance="4.7 KΩ", Wattage=W
R14 R15 R16 R17 R18 R19 R20: Resistance=100Ω, Wattage=1/16W
R21: Resistance=120Ω, Wattage=1/2W
R22: Resistance=100Ohm, Wattage=1/16W
R23: library part "RES 0402", Resistance=100Ohm, Wattage=1/16W
TP1 TP2 TP3 TP4 TP5 TP6 TP7 TP8 TP9: library part TEST-POINT-0001, "Oranange PC Test Point, Miniature Phoisphor Bronze Silver Plating Through Hole Mounting Type"
U1: library part IC-BUCK-0001, "IC REG BUCK ADJ 5A 10WSON", ComponentLink1Description=Datasheet, ComponentLink1URL=https://www.ti.com/general/docs/suppproductinfo.tsp?distId=10&gotoUrl=https%3A%2F%2Fwww.ti.com%2Flit%2Fgpn%2Ftps54561
U2: library part IC-STM32G431CBT6, "IC MCU 32BIT 128KB FLASH 48LQFP", Package=48LQFP, ComponentLink1Description=Datasheet, ComponentLink1URL=https://www.st.com/resource/en/datasheet/stm32g431cb.pdf
U3: library part IC-CAN-0001, "IC TRANSCEIVER 1/1 8SOIC", ComponentLink1Description=Datasheet, ComponentLink1URL=https://www.ti.com/lit/ds/symlink/tcan1044-q1.pdf?HQS=dis-dk-null-digikeymode-dsf-pf-null-wwe&ts=1728758303289&ref_url=https%253A%252F%252Fwww.ti.com%252Fgeneral%252Fdocs%252Fsuppproductinfo.tsp%253FdistId%253D10%2526gotoUrl%253Dhttps%253A%252F%252Fwww.ti.com%252Flit%252Fgpn%252Ftcan1044-q1

## Nets (pads, with @x,y where several pads share a name; then routed paths per layer and width w, separated by ;. In a path a pad name is that pad's centre, name@x,y a point inside that pad or via, vN(x,y) a via of type N, cw(c..) or ccw(c..) an arc to the next point about the centre after c; other vN are vias at no path point)
5V: C21.2 C27.2 C28.2 C29.2 C30.2 I1.3 I2.2 I2.4 J5.4 J6.4 J7.4 J8.4 J9.4 R3.2 R4.2 TP5.1 U3.3
7V: C12.2 C13.2 C14.2 C15.2 C16.2 C17.2 C18.2 C26.2 I2.3 L1.2 R7.2 TP4.1
BOOT: R11.2 U2.45
BOOT_7V: C8.2 U1.1
CAN_H: J3.3 J4.3 R21.2 U3.7
CAN_L: J3.2 J4.2 R21.1 U3.6
CAN_RX: TP7.1 U2.33 U3.4
CAN_RX_LED: Q9.1 U2.25
CAN_Standby: U2.32 U3.8
CAN_TX: TP6.1 U2.34 U3.1
CAN_TX_LED: Q8.1 U2.26
COMP: C20.2 R9.2 U1.7
"Debug  LED4": Q6.1 U2.16
"Debug  LED5": Q7.1 U2.17
"Debug LED1": Q3.1 U2.13
"Debug LED2": Q4.1 U2.14
"Debug LED3": Q5.1 U2.15
EN: R5.1 R8.2 U1.3
FB: R7.1 R10.2 U1.6
GND: B1.1 B1.5 B1.7 B2.6 B2.20 B2.21 C1.1 C2.1 C3.1 C4.1 C5.1 C6.1 C7.1 C9.1 C10.1 C11.1 C12.1 C13.1 C14.1 C15.1 C16.1 C17.1 C18.1 C19.2 C20.1 C21.1 C22.1 C23.1 C24.1 C25.1 C26.1 C27.1 C28.1 C29.1 C30.1 C31.1 C32.1 C33.1 C34.1 C35.1 C36.1 C37.2 C38.1 C39.1 C40.1 C41.1 C42.1 C43.1 D1.1 D3.1 DBG6.2 DBG7.2 I1.1 I2.1 J2.05 J2.07 J2.11 J3.1 J4.1 J5.3 J6.3 J7.3 J8.3 J9.3 Q1.3 Q2.2 Q3.2 Q4.2 Q5.2 Q6.2 Q7.2 Q8.2 Q9.2 R2.1 R6.1 R8.1 R10.1 R11.1 U1.8 U1.11 U2.19 U2.23 U2.35 U2.47 U3.2
I2C_SCL: B1.4 B2.9 J5.2 J6.2 J7.2 J8.2 J9.2 R12.1 TP9.1 U2.31
I2C_SDA: B1.3 B2.10 J5.1 J6.1 J7.1 J8.1 J9.1 R13.1 TP8.1 U2.30
NetC19_1: C19.1 R9.1
NetCAN_RX1_1: CAN_RX1.1 R23.2
NetCAN_RX1_2: CAN_RX1.2 Q9.3
NetCAN_TX1_1: CAN_TX1.1 R22.2
NetCAN_TX1_2: CAN_TX1.2 Q8.3
NetD2_1: D2.1 R3.1
NetD2_2: D2.2 Q2.3
NetDBG1_1: DBG1.1 R14.2
NetDBG1_2: DBG1.2 Q3.3
NetDBG2_1: DBG2.1 R15.2
NetDBG2_2: DBG2.2 Q4.3
NetDBG3_1: DBG3.1 R16.2
NetDBG3_2: DBG3.2 Q5.3
NetDBG4_1: DBG4.1 R17.2
NetDBG4_2: DBG4.2 Q6.3
NetDBG5_1: DBG5.1 R18.2
NetDBG5_2: DBG5.2 Q7.3
NetDBG6_1: DBG6.1 R19.2
NetDBG7_1: DBG7.1 R20.2
NetJ1_1: J1.1 Q1.2
NetQ1_1: Q1.1 R1.1 R2.2
NRST: C37.1 J2.12 U2.7
PWRGD: Q2.1 R4.1 U1.10
RT/CLK: R6.2 U1.5
SS/TR: C11.2 U1.4
SW: C8.1 D3.2 L1.1 U1.9
SYSJTCK-SWCLK: J2.06 U2.38
SYSJTDO-SWO: J2.08 U2.40
SYSJTMS-SWDIO: J2.04 U2.37
VBAT: C1.2 C2.2 C3.2 C4.2 C5.2 C6.2 C7.2 D1.2 F1.2 J1.2 R1.2 TP1.1 U2.1
VBAT_FUSED_7: C9.2 C10.2 F1.1 R5.2 TP2.1 U1.2
VCP_RX: J2.13 U2.11
VCP_TX: J2.14 U2.10
VDD: B1.2 B1.6 B1.8 B2.7 B2.19 C22.2 C23.2 C24.2 C25.2 C31.2 C32.2 C33.2 C34.2 C35.2 C36.2 C38.2 C39.2 C40.2 C41.2 C42.2 C43.2 I1.2 I1.4 J2.03 R12.2 R13.2 R14.1 R15.1 R16.1 R17.1 R18.1 R19.1 R20.1 R22.1 R23.1 TP3.1 U2.20 U2.21 U2.24 U2.36 U2.48 U3.5
pads on no net: B2.1 B2.2 B2.3 B2.4 B2.5 B2.8 B2.11 B2.12 B2.13 B2.14 B2.15 B2.16 B2.17 B2.18 J1.3 J2.01 J2.02 J2.09 J2.10 J3.4 J4.4 J5.T1 J5.T2 J6.T1 J6.T2 J7.T1 J7.T2 J8.T1 J8.T2 J9.T1 J9.T2 U2.2 U2.3 U2.4 U2.5 U2.6 U2.8 U2.9 U2.12 U2.18 U2.22 U2.27 U2.28 U2.29 U2.39 U2.41 U2.42 U2.43 U2.44 U2.46

## Silkscreen, mask and mechanical layers (free items; w line width, h text height)
Top Overlay:
  the board outline again, w0.254